# Altium PCB PCB_DBS_Module-v1.0.PcbDoc (part 3 of 4)
Units mil, origin at the board's own origin, x right, y up, seen from the top; angles counter-clockwise.
Board outline 5571 x 4173 mil, 4 copper layers (Top Layer, PWR + Signal, GND + Signal, Bottom Layer), stack 61.653 mil thick; 149 components, 108 nets, 494 pads, 359 vias.
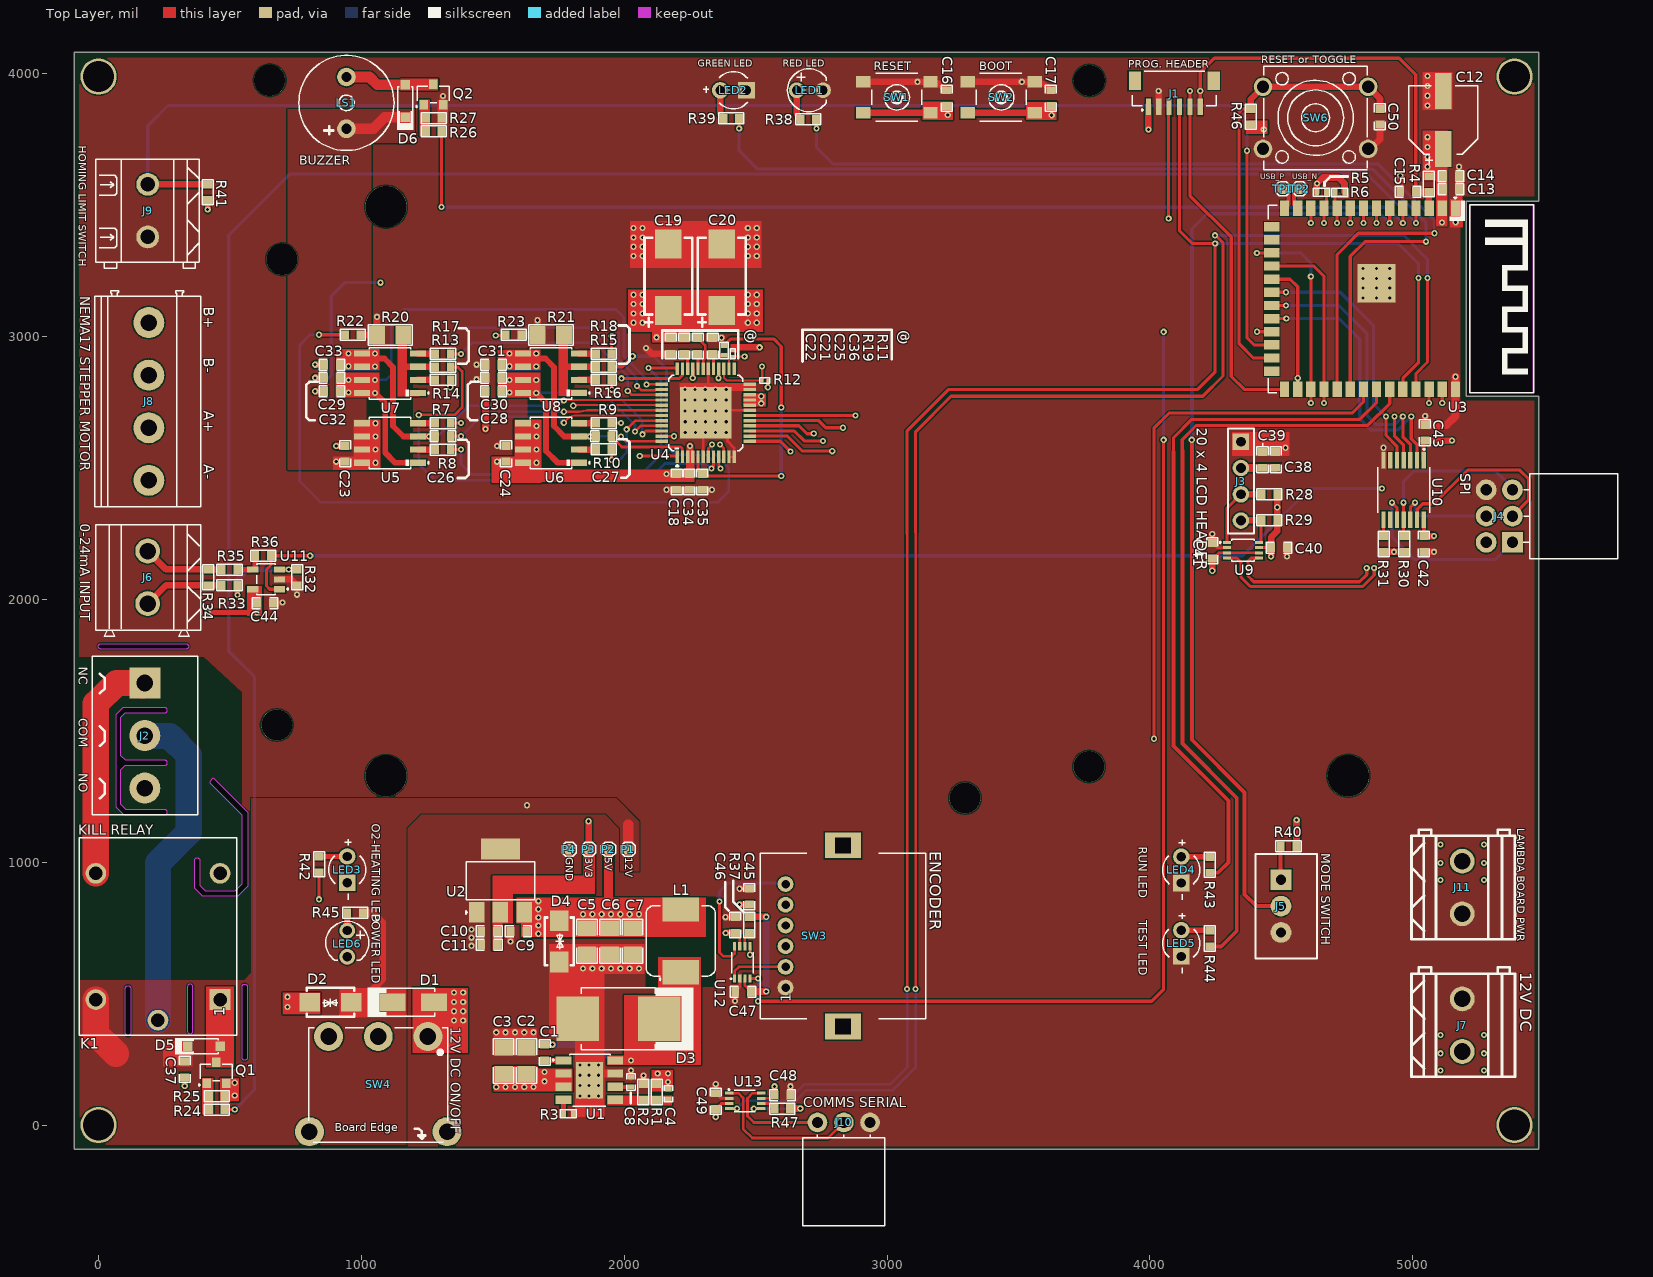
[diagram p0: Top Layer view]

## Part data (continued)
U5 U6 U7 U8: "MOSFET 2N-CH 60V 9.5A 8SOIC", LCSC Part Number=C541719, Manufacturer="Alpha & Omega Semiconductor", Supplier Part Number=785-1792-1-ND, Category=Transistors, ComponentLink1Description=http://www.aosmd.com/res/data_sheets/AOSD62666E.pdf?src-supplier=Digi-Key, ComponentLink1URL=http://www.aosmd.com/res/data_sheets/AOSD62666E.pdf?src-supplier=Digi-Key, ComponentLink2Description=https://datasheet.octopart.com/AOSD62666E-Alpha-%26-Omega-Semiconductor-datasheet-136498378.pdf?src-supplier=LKR, ComponentLink2URL=https://datasheet.octopart.com/AOSD62666E-Alpha-%26-Omega-Semiconductor-datasheet-136498378.pdf?src-supplier=LKR, Item Type=MOSFET, Manufacturer Part Number=AOSD62666E, Pricing="1=1.11, 10=0.911, 100=0.7084, 500=0.60046, 1000=0.48914 (USD)", RoHS=No, Stock=12025, Supplier=Digi-Key
U9: "IC TRANSLTR BIDIRECTIONAL 8VSSOP", Case/Package=VSSOP, High Level Output Current=-20uA, LCSC Part Number=C53434, Low Level Output Current=1mA, Manufacturer="Texas Instruments", Max Operating Temperature=85°C, Max Supply Voltage=5.5V, Min Operating Temperature=-40°C, Min Supply Voltage=1.65V, Nominal Supply Current=14.4uA, Output Current=1A, Package Quantity=3000, Supplier Part Number=595-TXS0102DCUR, Category="Voltage Level Shifters", Channel Type=Bidirectional, ComponentLink1Description=https://datasheet.ciiva.com/22653/1846850-22653373.pdf?src-supplier=Farnell, ComponentLink1URL=https://datasheet.ciiva.com/22653/1846850-22653373.pdf?src-supplier=Farnell, ComponentLink2Description=https://datasheet.ciiva.com/15096/getdatasheetpartid-118249-15096172.pdf?src-supplier=Verical, ComponentLink2URL=https://datasheet.ciiva.com/15096/getdatasheetpartid-118249-15096172.pdf?src-supplier=Verical, ComponentLink3Description=https://datasheet.ciiva.com/1508/1857232-1508821.pdf?src-supplier=Element14, ComponentLink3URL=https://datasheet.ciiva.com/1508/1857232-1508821.pdf?src-supplier=Element14, ComponentLink4Description=https://datasheet.ciiva.com/28499/1863639-28499676.pdf?src-supplier=Element14, ComponentLink4URL=https://datasheet.ciiva.com/28499/1863639-28499676.pdf?src-supplier=Element14, ComponentLink5Description=https://datasheet.ciiva.com/46395/1863639-46395871.pdf?src-supplier=Element14, ComponentLink5URL=https://datasheet.ciiva.com/46395/1863639-46395871.pdf?src-supplier=Element14, ComponentLink6Description=https://datasheet.ciiva.com/1899/txs0102-1899369.pdf?src-supplier=Digikey, ComponentLink6URL=https://datasheet.ciiva.com/1899/txs0102-1899369.pdf?src-supplier=Digikey, ComponentLink7Description=https://datasheet.ciiva.com/1899/txs0102-1899368.pdf?src-supplier=Digikey, ComponentLink7URL=https://datasheet.ciiva.com/1899/txs0102-1899368.pdf?src-supplier=Digikey, ComponentLink8Description=https://datasheet.ciiva.com/1899/txs0102-1899370.pdf?src-supplier=Digikey, ComponentLink8URL=https://datasheet.ciiva.com/1899/txs0102-1899370.pdf?src-supplier=Digikey, ComponentLink9Description=https://datasheet.ciiva.com/14287/txs0102-14287516.pdf?src-supplier=Avnet, ComponentLink9URL=https://datasheet.ciiva.com/14287/txs0102-14287516.pdf?src-supplier=Avnet, ComponentLink10Description=https://datasheet.ciiva.com/14287/txs0102-14287518.pdf?src-supplier=Avnet, ComponentLink10URL=https://datasheet.ciiva.com/14287/txs0102-14287518.pdf?src-supplier=Avnet, Data Rate=24Mbps, Height=900um, Item Type=IC, Lead Free="Lead Free", Length=2.3mm, Logic Function=Translator, Manufacturer Part Number=TXS0102DCUR, Number of Bits=2, Number of Channels=2, Number of Circuits=1, Number of Inputs=2, Number of Outputs=2NUMBER, Packaging="Tape and Reel", Pins=8, Pricing="1=0.89, 10=0.739, 50=0.739, 100=0.561, 1000=0.383, 10000=0.313 (USD)", Propagation Delay=4.6ns, Quiescent Current=14.4uA, Radiation Hardening=No, Reach SVHC Compliant=No, RoHS=Yes, RoHS Compliant=Yes, Series=-, Stock=149802, Supplier=Mouser, Thickness=850um, Turn-On Delay Time=260ns, Weight=0.000339oz, Width=2mm
U10: "IC TRANSLATOR UNIDIR 14TSSOP", Case/Package=71Case, LCSC Part Number=C4364118, Manufacturer="Texas Instruments", Height=1.2mm, Item Type=IC, Length=5mm, Manufacturer Part Number=TXU0304PWR, Number of Bits=4NUMBER, Pins=14NUMBER, Pricing="1=0.85, 10=0.745, 50=0.745, 100=0.581, 1000=0.387, 10000=0.33 (USD)", RoHS=No, Stock=25859, Supplier=Mouser, Thickness=1mm, Width=4.4mm
U11: "SOT-23-5 Precision OpAmps ROHS", LCSC Part Number=C248602, Manufacturer=3PEAK, Package=SOT-23-5, ComponentLink1Description=LCSC, ComponentLink1URL=https://www.lcsc.com/product-detail/Precision-OpAmps_3PEAK-TP5591-TR_C248602.html, Item Type=OpAmp, Manufacturer Part Number=TP5591-TR
U12 U13: "IC TRNSLTR BIDIRECTIONAL US8", Case/Package=VSSOP, High Level Output Current=-20uA, Low Level Output Current=20uA, Manufacturer="Texas Instruments", Max Operating Temperature=85°C, Max Supply Voltage=5.5V, Min Operating Temperature=-40°C, Min Supply Voltage=1.65V, Output Current=50mA, Package Quantity=1, Category="Integrated Circuits (ICs)", ComponentLink1Description=https://datasheet.ciiva.com/4226/sces641b-4226901.pdf?src-supplier=Arrow+Electronics, ComponentLink1URL=https://datasheet.ciiva.com/4226/sces641b-4226901.pdf?src-supplier=Arrow+Electronics, ComponentLink2Description=https://datasheet.ciiva.com/15096/getdatasheetpartid-226009-15096242.pdf?src-supplier=Verical, ComponentLink2URL=https://datasheet.ciiva.com/15096/getdatasheetpartid-226009-15096242.pdf?src-supplier=Verical, ComponentLink3Description=https://datasheet.ciiva.com/14287/txb0102-14287498.pdf?src-supplier=Avnet, ComponentLink3URL=https://datasheet.ciiva.com/14287/txb0102-14287498.pdf?src-supplier=Avnet, ComponentLink4Description=https://datasheet.ciiva.com/14287/txb0102-14287370.pdf?src-supplier=Avnet, ComponentLink4URL=https://datasheet.ciiva.com/14287/txb0102-14287370.pdf?src-supplier=Avnet, ComponentLink5Description=https://datasheet.ciiva.com/6619/txb0102-6619255.pdf?src-supplier=Digi-Key, ComponentLink5URL=https://datasheet.ciiva.com/6619/txb0102-6619255.pdf?src-supplier=Digi-Key, ComponentLink6Description=https://datasheet.ciiva.com/6619/txb0102-6619256.pdf?src-supplier=Digi-Key, ComponentLink6URL=https://datasheet.ciiva.com/6619/txb0102-6619256.pdf?src-supplier=Digi-Key, ComponentLink7Description=https://datasheet.ciiva.com/6619/txb0102-6619257.pdf?src-supplier=Digi-Key, ComponentLink7URL=https://datasheet.ciiva.com/6619/txb0102-6619257.pdf?src-supplier=Digi-Key, Contact Plating=Gold, Data Rate=100Mbps, Height=0.85mm, Lead Free="Lead Free", Length=2.3mm, Logic Function=Translator, Manufacturer Part Number=TXB0102DCUT, Mount="Surface Mount", Number of Bits=2, Number of Channels=2, Number of Inputs=2, Number of Pins=8, Output Type=3-STATE, Packaging="Tape and Reel", Pricing 1="1=0.79330, 10=0.66470, 25=0.65820, 250=0.37450, 500=0.36200, 1000=0.29770, 2500=0.28440 (USD)", Propagation Delay=31ns, Radiation Hardening=No, REACH SVHC="No SVHC", RoHS=Yes, RoHS Compliant=Yes, Series=-, Stock 1=10, Supplier 1="Arrow Electronics", Supplier Part Number 1=TXB0102DCUT, Turn-On Delay Time=7.4ns, Weight=0.000339oz, Width=2mm

## Free pads (board coordinates)
  round 137.8 hole 118.11: MH1(0,0) MH2(0,3989) MH3(5387,3989) MH4(5387,0)
  round 118.11 hole 118.11: MH3(651,3975) MH3(678,1522) MH3(698,3294) MH3(3296,1244) MH3(3768,1364) MH3(3769,3974)
  round 157.48 hole 157.48: MH3(1093.32,1328.89) MH3(1093.32,3494.25) MH3(4754.74,1328.89)

## Via types
v1: diameter 23.62, hole 11.81, Top Layer to Bottom Layer, 359 vias

## Nets (pads, with @x,y where several pads share a name; then routed paths per layer and width w, separated by ;. In a path a pad name is that pad's centre, name@x,y a point inside that pad or via, vN(x,y) a via of type N, cw(c..) or ccw(c..) an arc to the next point about the centre after c; other vN are vias at no path point)
0-24mA: R36.2 U3.39 U11.1 | length 5073.2
  Top Layer w12: U11.1@688.18,2038.6 651.4,2038.6 639,2051 639,2114 656,2131 R36.2@656,2166 v1(805,2166) ; v1(5112,2747) U3.39@5112,2799
  GND + Signal w12: v1(4882,2422) 5040,2422 5112,2494 v1(5112,2747)
  Bottom Layer w12: v1(805,2166) 4353,2166 4609,2422 v1(4882,2422)
3V3: C10.2 C11.2 C12.1 C13.2 C14.2 C41.1 C43.1 C44.2 C47.1 C49.1 J1.1 P3.1 R4.2 R5.2 R6.2 R11.1 R12.1 R37.2 R40.2 R41.2 R46.1 R47.2 U2.2 U3.2 U4.20 U4.21 U4.22 U9.3 U9.6 U10.1 U11.5 U12.3 U13.3 | length 4079.1
  Top Layer w10: C49.1@2348,61 2350.5,61 2360.5,71 2360.5,73.5 2369.16,82.16 U13.3@2398.98,82.16 ; U12.3@2459,557.95 2459,531 2470.5,519.5 2473,519.5 2483,509.5 2483,508.25 C47.1@2483,507 ; C41.1@4239.5,2155 4261.66,2177.16 U9.3@4292.98,2177.16 U9.6@4415.02,2177.16
  Top Layer w12: U4.20@2477.17,2739.2 U4.21@2477.17,2758.89 U4.22@2477.17,2778.57 ; R12.1@2545.83,2833 2545.83,2807.17 v1(2546,2807)
  Top Layer w15: U10.1@5041.39,2529.38 C43.1@5041.39,2603.61
  Top Layer w20: v1(415,1950) v1(603,1950) C44.2@603,1986 603,1988.5 C44.2@598,1993.5 ; v1(415,3483) R41.2@415,3519
  Top Layer w25: U11.5@585.82,2038.6 585.82,2005.68 C44.2@598,1993.5 ; U2.2@1529,810 1533.86,814.86 1533.86,886.86 ; v1(1864,1156) 1865,1155 1865,1057.5 1866,1056.5 1866,974.91 ; 1865,987 P3.1@1865,1050 ; v1(2348,30.5) C49.1@2348,61 ; 2422,2959 v1(2515,2959) ; R37.2@2477,792.25 v1@2535,792.25 ; C47.1@2483,508.25 v1@2535,508.25 ; R47.2@2631,63 v1(2669.5,63) ; v1(3994.18,3787.5) J1.1@3994.18,3873.59 J1.1@3994.18,3880 ; v1(4237,2109) C41.1@4237,2155 ; R46.1@4383,3806 4383,3804 4399.5,3787.5 v1(4433.15,3787.5) ; R40.2@4557.28,1060.73 4557.28,1160.28 v1(4558,1161) ; R5.2@4634.5,3549 4634.5,3581.5 4658,3605 4717,3605 4740,3582 R6.2@4740,3550 ; C43.1@5041.39,2603.61 5149,2603.61 v1(5149,2604) ; v1@5052.52,3642.5 v1(5056.12,3646.1) ; v1@5056.19,3649 5061,3649 R4.2@5061,3610 C14.2@5109.5,3610 ; C14.2@5109.5,3619.5 C14.2@5109.5,3610 ; U3.2@5112,3487.98 U3.2@5117.22,3482.76 ; C14.2@5115,3610 C14.2@5109.5,3610 ; C12.1@5115,3711.59 cw(c5118.41,3711.59) C12.1@5116,3714 ; U3.2@5118,3479.48 5109.5,3487.98 C14.2@5109.5,3610
  GND + Signal w25: v1(2540,508.25) 2540,378 2669.5,248.5 v1(2669.5,63) ; v1(4237,2109) 4237,1753 4558,1432 v1(4558,1161)
  Bottom Layer w25: v1(2540,508.25) v1(2540,792.25)
  other v1: 2521,2746 2521,2773 5111,3433.91 4635,3582 5056.12,3683.6 5056.12,3721.1 5056.12,3758.6
5V: C4.2 C5.2 C6.2 C7.2 C9.2 C38.2 C39.2 C40.1 C42.1 C45.1 C46.1 C48.1 D4.2 J3.2 L1.2 P2.1 R1.2 R28.2 R29.2 R30.2 R31.1 SW3.5 U2.3 U9.7 U10.14 U12.7 U13.7 | length 1050.7
  Top Layer w10: C46.1@2423,731 2425.5,731 2439.31,717.19 U12.7@2439.31,680 ; U13.7@2521.02,101.84 2562,101.84 2572,111.84 C48.1@2572,114
  Top Layer w12: U9.7@4415.02,2196.84 4415.1,2196.92 4460.92,2196.92 C40.1@4461,2197
  Top Layer w15: C42.1@5042,2241 U10.14@5042,2302.78
  Top Layer w25: 1913,826 1916,829 ; v1(2386,731) C46.1@2423,731 ; v1(2438.44,838.56) C45.1@2475.44,838.56 ; C45.1@2476,839 C45.1@2476.44,838.56 ; C48.1@2572,114 v1(2572,147.5) ; v1(4460.92,2163.42) C40.1@4460.92,2196.92 ; C40.1@4461,2197 4461,2237 4484,2260 R29.2@4484,2301 v1(4484,2350.5) R28.2@4484,2400 ; R31.1@4889,2181 v1(4928,2181) R30.2@4967,2181 ; C42.1@5042,2241 v1(5080,2241)
  Top Layer w30: J3.2@4346,2500 C38.2@4477,2500
  Top Layer w35: 1940,829 P2.1@1940,1050
  other v1: 2166,164 2127,196 2166,196 1673,728 1673,759 1673,790 1843,802 1878.5,802 1914,802 1949.5,802 1985,802 2020.5,802 2056,802 1673,821 1673,852
12V: C2.2 C3.2 C18.2 C19.1 C20.1 C21.1 C22.1 C23.1 C24.1 C34.2 C37.1 D1.1 D2.2 D5.2 D6.2 K1.4 LS1.1 P1.1 R45.1 U1.2 U1.3 U4.3 U4.4 U4.33 U5.5 U5.6 U5.7 U5.8 U6.5 U6.6 U6.7 U6.8 | length 1727.1
  Top Layer w12: v1@2260.63,2838.37 v1(2260.63,2841.81) U4.33@2260.63,2876
  Top Layer w25: v1(904,2524) C23.1@938,2524 ; U5.8@1002.7,2520 v1(1053.7,2520) ; U5.7@1002.7,2570 v1(1053.7,2570) ; U5.6@1002.7,2620 v1(1053.7,2620) ; U5.5@1002.7,2670 v1(1053.7,2670) ; R45.1@1006,807 1008.32,807 1008.5,806.82 1045.18,806.82 1081,771 1081,554.17 1030.83,504 ; v1@1034,504 1034,473 v1@1041.5,465.5 ; v1(1044,504) v1@1048.83,504 ; v1(1516,2524) C24.1@1550,2524 ; U6.8@1614.7,2520 v1(1665.7,2520) ; U6.7@1614.7,2570 v1(1665.7,2570) ; U6.6@1614.7,2620 v1(1665.7,2620) ; U6.5@1614.7,2670 1615.39,2669.31 1655.58,2669.31 v1(1665.7,2659.19) ; C2.2@1628,194 C2.2@1629,195 ; U1.2@1767.67,195 U1.2@1768.67,196 ; v1(2123,2997) 2126,2994 C21.1@2228,2994 ; v1@2165,2476.5 2165,2477 C18.2@2199,2477 ; 2248,2517.58 2247.15,2518.44 2247.15,2536.15 2250,2539.01 v1(2250,2584)
  Top Layer w40: LS1.1@943,3790.58 1044.58,3790.58 1087.99,3833.99 D6.2@1167,3833.99 ; P1.1@2015,1050 2015,1143
  Top Layer w100: K1.4@-10.44,477.69 -10.44,347.44 66,271
  other v1: 1513,145 1548.5,145 1584,145 1619.5,145 1655,145 1697,166.5 1697,202 1044,433 1044,468.5 1630,1217 2161,2477 2035,3052.5 2069,3052.5 2470,3052.5 2504,3052.5 2035,3088 2069,3088 2470,3088 2504,3088 2035,3123.5 2069,3123.5 2470,3123.5 2504,3123.5 2035,3159 2069,3159 2470,3159 2504,3159
BMA1: C26.2 C33.1 J8.3 U4.40 U5.3 U7.5 U7.6 | length 1425.5
  Top Layer w8: v1(1770,2756.19) cw(c1776.52,2749.67) 1776.52,2758.89 U4.40@2142.52,2758.89
  Top Layer w22: 1056.5,2916 1088,2916 1120.5,2883.5 1120.5,2659.5 1160,2620 U5.3@1215.3,2620
  Top Layer w25: 1052,2910.3 1052,2911.5 1056.5,2916 ; U5.3@1215.3,2620 v1(1257,2620) C26.2@1278,2620
  Bottom Layer w8: v1(1257,2620) 1290,2620
  Bottom Layer w10: 1290,2620 1407,2737 1750.81,2737 v1(1770,2756.19)
  other v1: 1052,2885.61 951,2887 951,2935 1052,2935
BMA2: C29.2 C32.1 J8.4 U4.37 U5.1 U7.7 U7.8 | length 1921
  Top Layer w10: v1(2084,2817.94) U4.37@2142.52,2817.94
  Top Layer w22: v1@1056.5,2781.11 1090.5,2747.11 1090.5,2557.5 1128,2520 U5.1@1215.3,2520
  Top Layer w25: v1(1052,2785.61) 1052.39,2785.61 1056.5,2781.5 v1@1056.5,2781.11
  Bottom Layer w10: v1(1052,2835) 1094,2835 1113,2854 1113,3055 1161,3103 1968,3103 1999,3072 1999,2924 2084,2839 v1(2084,2817.94)
  other v1: 951,2787 951,2835
BMB1: C27.2 C31.1 J8.1 U4.48 U6.3 U8.5 U8.6 | length 758
  Top Layer w10: v1(1987,2620) 2005.19,2601.81 U4.48@2142.12,2601.81
  Top Layer w22: 1668.5,2916 1700,2916 1732.5,2883.5 1732.5,2659.5 1772,2620 U6.3@1827.3,2620
  Top Layer w25: U6.3@1827.3,2620 v1(1869,2620) C27.2@1892,2620
  Bottom Layer w10: v1(1869,2620) v1(1987,2620)
  other v1: 1665,2885.61 1563,2887 1563,2935 1665,2935
BMB2: C28.1 C30.2 J8.2 U4.45 U6.1 U8.7 U8.8 | length 936.7
  Top Layer w10: v1(2041,2639) 2062.46,2660.46 U4.45@2142.52,2660.46
  Top Layer w22: v1@1668.5,2781.11 1702.5,2747.11 1702.5,2564.5 1747,2520 U6.1@1827.3,2520
  Bottom Layer w10: v1@1664,2785.61 1919.39,2785.61 2041,2664 v1(2041,2639)
  other v1: 1665,2785.61 1563,2787 1563,2835 1665,2835
BUZZER: R26.1 U3.5 | length 4026
  Top Layer w12: v1(1305,3493.19) R26.1@1305,3781 ; v1@4962,3432.06 U3.5@4962,3487.98
  Bottom Layer w12: v1(1305,3493.19) 1306.19,3492 4901.76,3492 v1(4961.85,3431.91)